# Altium PCB PIXRACER-R12.PcbDoc (part 1 of 2)
Units mm, origin at the board's own origin, x right, y up, seen from the top; angles counter-clockwise.
Board outline 36 x 36 mm, 4 copper layers (TOP, 2, 3, BOT), stack 1.492 mm thick; 137 components, 127 nets, 565 pads, 429 vias.
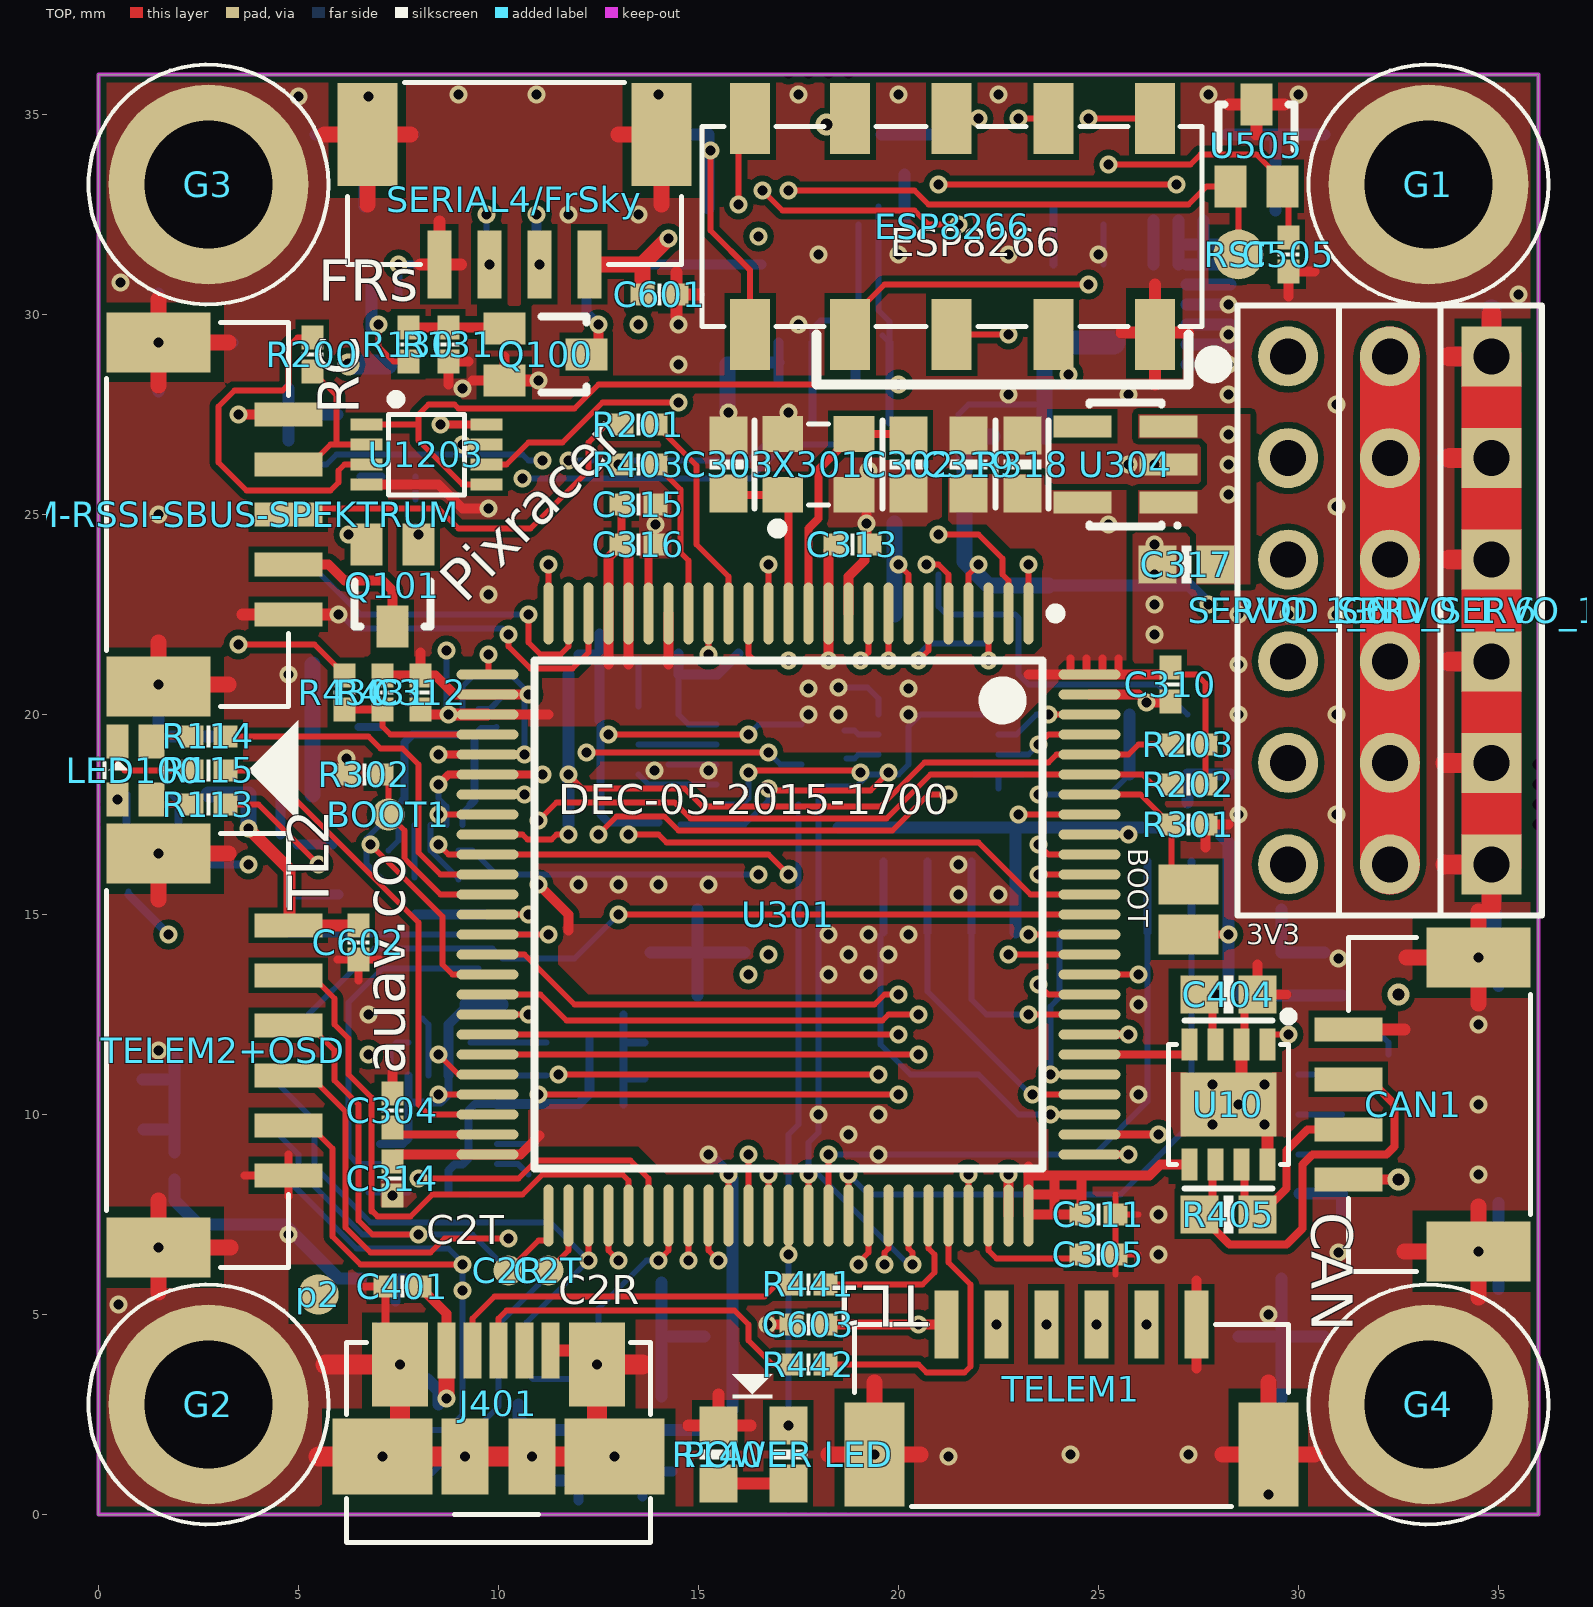
[diagram p0: TOP view]
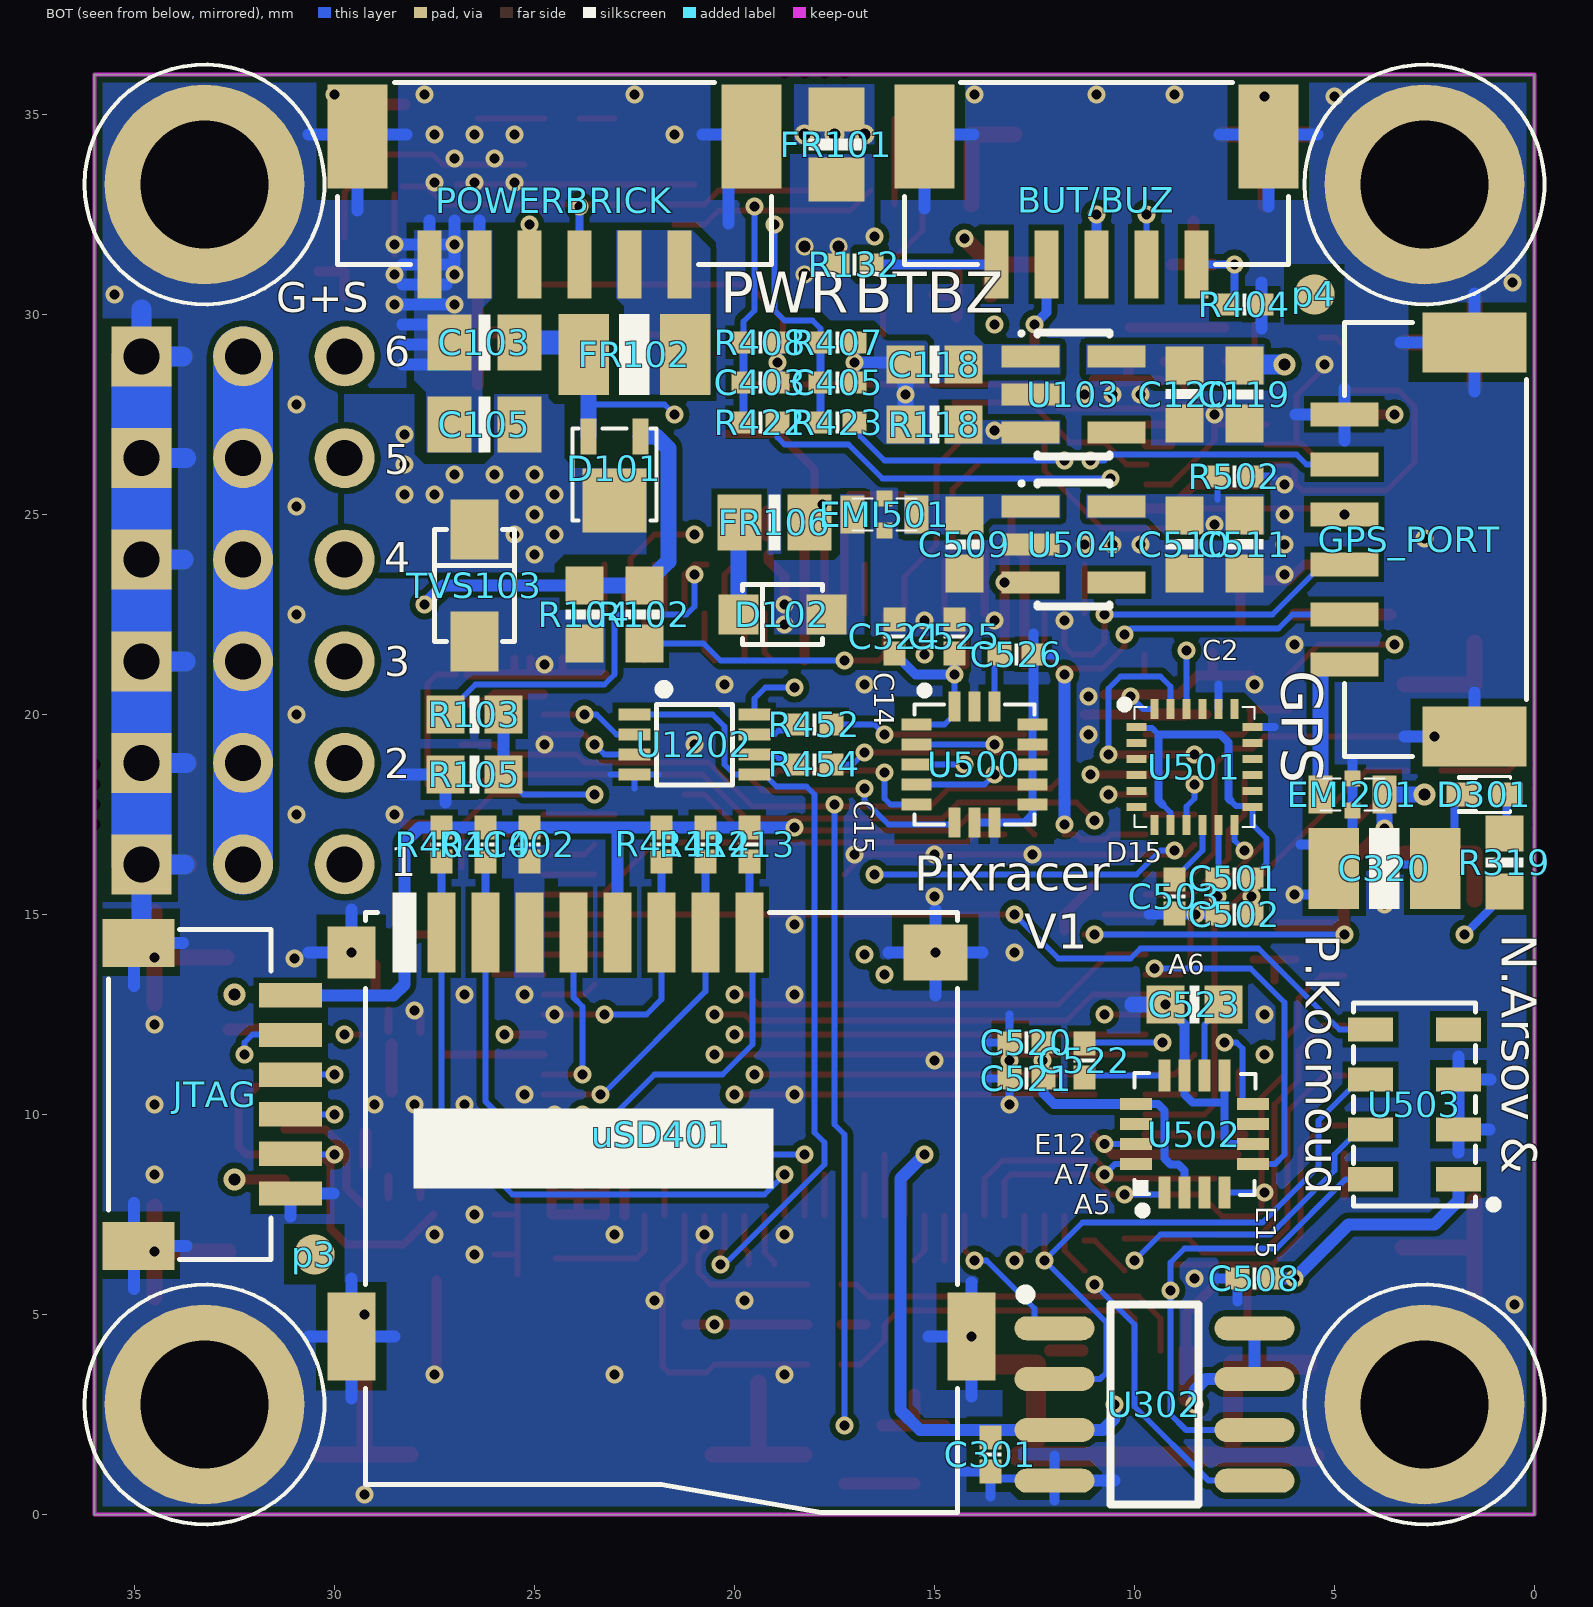
[diagram p1: BOT view, seen from below]
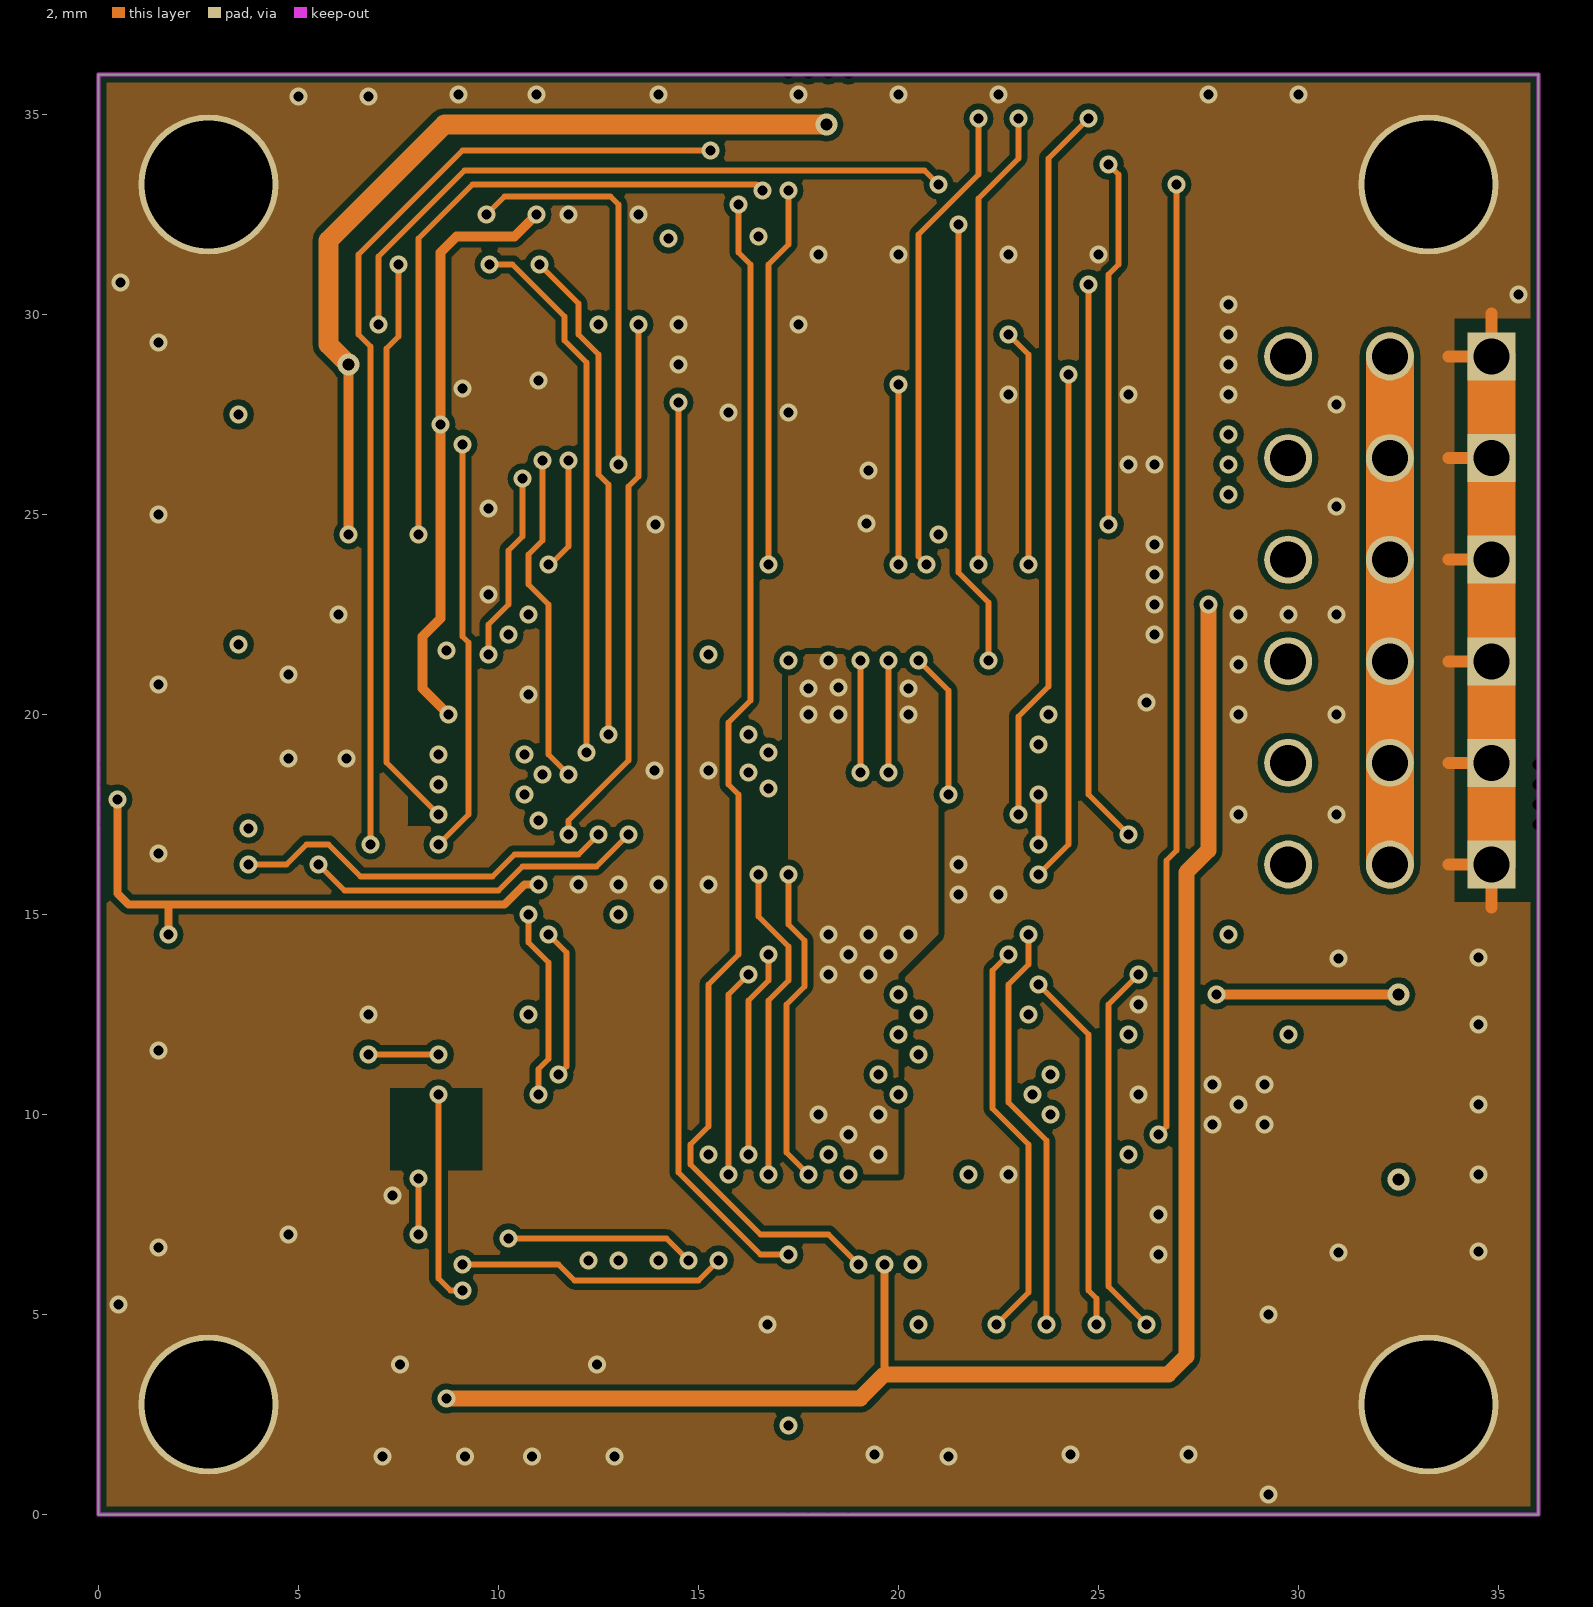
[diagram p2: 2]
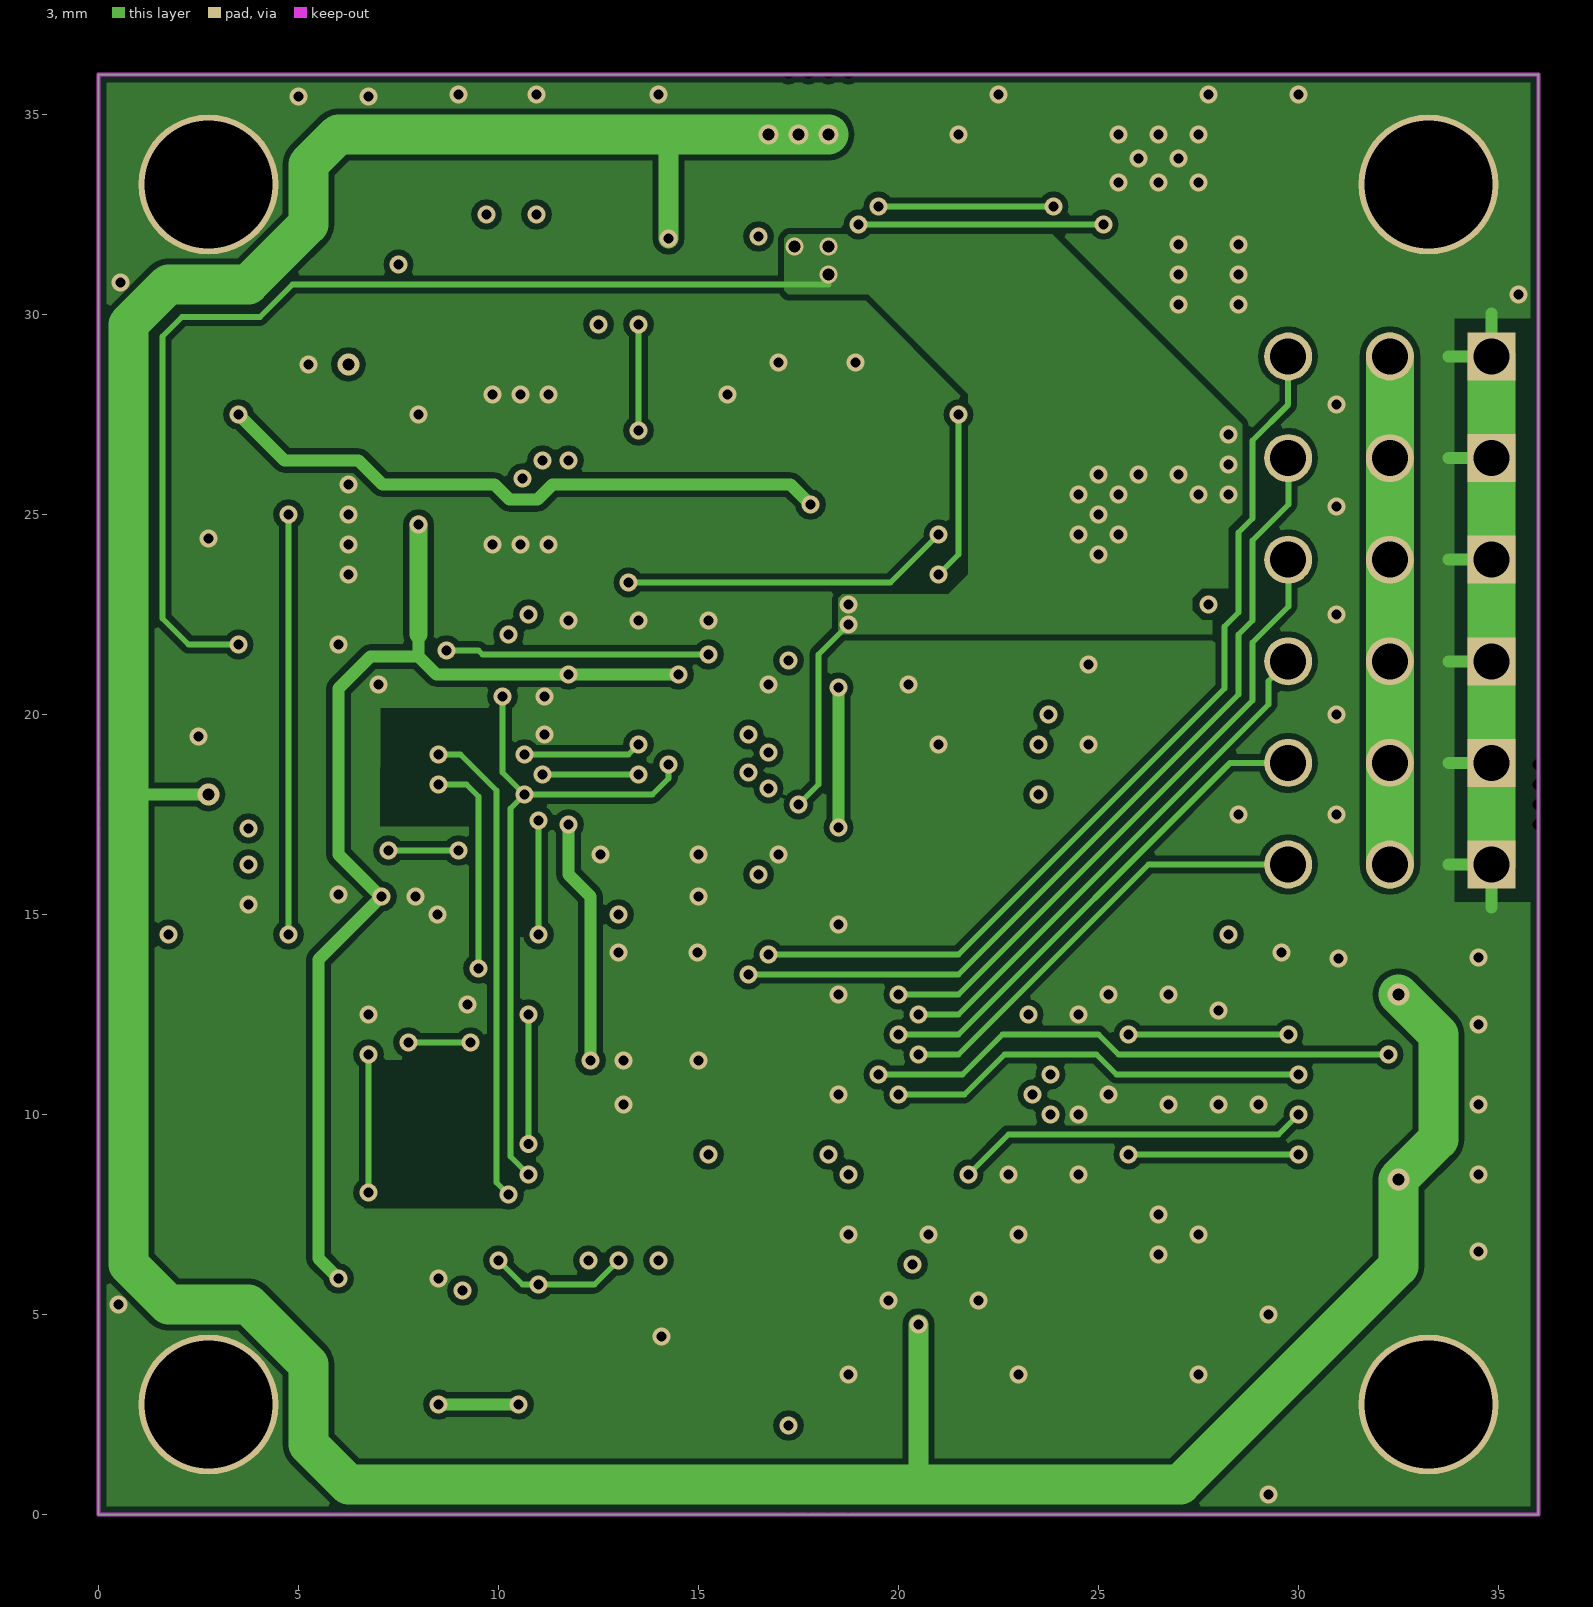
[diagram p3: 3]

## Layer stack, top to bottom
TOP: signal copper 0.0356
Dielectric: core 0.45, FR-4, Dk 4.8
2: signal copper 0.0356
Dielectric: prepreg 0.45, FR-4, Dk 4.8
3: signal copper 0.0356
Dielectric: core 0.45, FR-4, Dk 4.8
BOT: signal copper 0.0356

## Board outline
0,-0.003 36,-0.003 36,36 35.997,35.997 0,35.997 0,-0.003

## Design rules (kind name [scope] priority, off if disabled: settings)
Clearance [All] p1: gap=0.15
FabricationTestPointUsage TestPointUsage [All] p1: valid=0 allowmultiple=FALSE
FabricationTestpoint Testpoint [All] p1: side=3 testpointundercomponent=TRUE minsize=1.016 maxsize=2.54 preferedsize=1.524 minholesize=0 maxholesize=1.016 preferedholesize=0.813 testpointgrid=0.025 allowsidetop=TRUE allowsidebottom=TRUE usegrid=TRUE gridtolerance=0
PolygonConnect [All] p1: connectstyle=Direct reliefconductorwidth=0.3 reliefentries=4 polygonreliefangle="90 Angle" airgapwidth=0.15
RoutingVias [All] p1: holewidth=0.25 width=0.45 viastyle="Through Hole" minholewidth=0.25 minwidth=0.45 maxholewidth=0.25 maxwidth=0.45
SolderMaskExpansion [All] p1: expansion=0.05
Width [All] p1: maxlimit=0.15 minlimit=0.15 preferedwidth=0.15
26 further rules are at their usual default settings.

## Classes and differential pairs
component class PIXRACER-POWER-R09: BAT2- BAT3- BAT4- BAT5- BAT6- C103 C105 C118 C119 C120 D101 D102 FR101 FR102 FR106 G1 G2 G3 G4 LED100 p2 p3 p4 PDB+1 PDB+2 PDB+3 PDB+4 PDB+5 PDB+6 PGND1 PGND2 PGND3 PGND4 "POWER LED" Q100 Q101 R102 R103 R104 R105 R113 R114 R115 R118 R130 R131 R132 R140 TVS103 U103
component class PIXRACER-FMU-R09: 3.3 3V3 BOOT BOOT1 C2R C2T C301 C302 C303 C304 C305 C310 C311 C312 C313 C314 C315 C316 C317 C319 C320 C505 D301 JTAG R301 R302 R318 R319 RST U301 U302 U304 U505 X301
component class PIXRACER-IMU-R09: C501 C502 C503 C508 C509 C510 C511 C520 C521 C522 C523 C524 C525 C526 EMI501 R502 U500 U501 U502 U503 U504
component class PIXRACER-SD-USB-R09: C401 C402 C403 C404 C405 CAN1 J401 POWERBRICK R401 R405 R407 R408 R410 R411 R412 R413 R422 R423 R430 R431 R441 R442 U10 uSD401
component class PIXRACER-SERIALS-R09: BUT/BUZ C601 C602 C603 EMI201 ESP8266 GND_SERVO_1_6 GPS_PORT PPM-RSSI-SBUS-SPEKTRUM R200 R201 R202 R203 R403 R404 R452 R454 SERIAL4/FrSky SERVO_1_6 TELEM1 TELEM2+OSD U1202 U1203 VDD_SERVO_1_6

## Components (designator, comment, footprint, x,y, rotation, side; value= is the part's Value field where it differs from the comment)
3V3 "3V3" PAD1#1 27.25,14.5 r180 top
BOOT "BOOT" PAD1#1 27.25,15.75 r0 top (schematic designator B0)
BOOT1 "BOOT1" PAD1#2 7.25,17.5 r90 top
BUT/BUZ "GH" Molex_Clik_1.25_5H#1 10.95,31.25 r180 bottom locked
C2R "CAN2_RX" PAD1#3 10.25,6.1 r90 top
C2T "CAN2_TX" PAD1#3 11.25,6.1 r90 top
C103 "100uF 10V" 0805A 26.25,29.3 r0 bottom
C105 "100uF 10V" 0805A 26.25,27.25 r0 bottom
C118 "10uF 10V" 0603A#1 15,28.75 r180 bottom
C119 "10uF 6.3V" 0603A#1 7.25,28.003 r90 bottom
C120 "100n" 0603A#1 8.75,28.003 r90 bottom
C301 "100n" 0402A 13.6,1.5 r270 bottom
C302 "8p" 0603A#1 20.25,26.25 r90 top
C303 "8p" 0603A#1 15.75,26.25 r270 top
C304 "2u2" 0402A 7.35,10.1 r270 top
C305 "2u2" 0402A 25,6.5 r180 top
C310 "100n" 0402A 26.8,20.75 r270 top
C311 "100n" 0402A 25,7.5 r0 top
C312 "100n" 0402A 8.05,20.55 r90 top
C313 "100n" 0402A 18.85,24.25 r0 top
C314 "100n" 0402A 7.35,8.4 r270 top
C315 "2u2" 0402A 13.5,25.25 r0 top
C316 "2u2" 0402A 13.5,24.25 r0 top
C317 "2u2" 0603A#1 27.2,23.75 r0 top
C319 "10u" 0603A#1 21.75,26.25 r270 top
C320 "220uF 4V" 1206A 3.75,16.15 r180 bottom
C401 "100n" 0402A 7.6,5.7 r180 top
C402 "100n" 0402A 25.127,16.75 r90 bottom locked
C403 "100n" 0402A 19.35,28.3 r0 bottom
C404 "2u2" 0603A#1 28.25,13 r180 top
C405 "100n" 0402A 17.425,28.3 r0 bottom
C501 "2u2" 0402A 7.5,15.9 r0 bottom
C502 "100n" 0402A 7.5,15 r0 bottom
C503 "100n" 0402A 9,15.45 r270 bottom
C505 "100n" 0402A 29.75,31.5 r270 top
C508 "100n" 0402A 7,5.9 r0 bottom
C509 "2u2" 0603A#1 14.25,24.25 r90 bottom
C510 "100n" 0603A#1 8.75,24.253 r90 bottom
C511 "10u" 0603A#1 7.25,24.253 r90 bottom
C520 "2u2" 0402A 12.7,11.8 r0 bottom
C521 "100n" 0402A 12.7,10.9 r0 bottom
C522 "220n" 0402A 11.25,11.35 r270 bottom
C523 "4u7" 0603A#1 8.5,12.75 r180 bottom
C524 "2u2" 0402A 16,21.95 r90 bottom
C525 "100n" 0402A 14.5,21.95 r90 bottom
C526 "0u47" 0402A 12.95,21.5 r180 bottom
C601 "2u2" 0402A 14.025,30.5 r180 top
C602 "2u2" 0402A 6.5,14.3 r90 top
C603 "2u2" 0402A 17.75,4.75 r0 top
CAN1 "GH" Molex_1.25_click_4#1 31.25,10.25 r270 top locked
D101 "PMEG2020CP" pmeg2020cp 23,25.75 r180 bottom
D102 "PMEG1030" SOD323F 18.8,22.5 r0 bottom
D301 "BAS70-02V" SOD-523 1.25,18 r180 bottom
EMI201 "EMI_KNH16" EMI_KNH16_0603 4.55,18 r0 bottom
EMI501 "EMI_KNH16" EMI_KNH16_0603 16.25,25 r180 bottom
ESP8266 "2x5 0.1\"" 2.54MM_10PIN_SMD 21.35,32.2 r180 top locked
FR101 "1A RST FUSE" 0805A 17.45,34.25 r270 bottom
FR102 "2A RST FUSE" 1206A 22.5,29 r0 bottom
FR106 "0.3A RST FUSE" 0805A 19,24.8 r0 bottom
G1 "GND" SMT_PAD_ROUND#1 33.923,33.947 r0 top locked
G2 "GND" SMT_PAD_ROUND#2 3.573,3.497 r0 top locked
G3 "GND" SMT_PAD_ROUND#3 2.423,33.947 r0 top locked
G4 "GND" SMT_PAD_ROUND#4 33.728,1.902 r0 top locked
GND_SERVO_1_6 "Header 6" HDR1X6#1 34.823,16.25 r90 top locked
GPS_PORT "GH" Molex_Clok_1.25_6H#1 4.75,24.375 r270 bottom locked
J401 "miniUSB" USBmicro_B 10,0 r0 top locked
JTAG "JST SM06B" SM06B-SRSH-TB 33.05,10.5 r90 bottom locked
LED100 "LTST-C19HE1WT" LTST-C19HE1WT 0.9,18.6 r0 top
p2 "" SMT_PAD 5.5,5.5 r270 top
p3 "" SMT_PAD 30.5,6.5 r90 bottom
p4 "" SMT_PAD 5.5,30.5 r90 bottom
"POWER LED" "GREEN" 0603A#1 17.25,1.5 r270 top
POWERBRICK "JST GH" Molex_Clok_1.25_6H#2 24.5,31.25 r180 bottom locked
PPM-RSSI-SBUS-SPEKTRUM "GH" Molex_Clik_1.25_5H#2 4.75,25 r90 top locked
Q100 "DMG1012UW" 2N7002-SOT323 10.15,29.65 r270 top
Q101 "BSS223PW" 2N7002-SOT323 8,24.25 r180 top
R102 "10K" 0603A#1 22.25,22.5 r90 bottom
R103 "220R" 0603A#1 26.5,20 r180 bottom
R104 "470R" 0603A#1 23.75,22.5 r90 bottom
R105 "220R" 0603A#1 26.5,18.5 r0 bottom
R113 "100R" 0402A 2.75,17.75 r0 top
R114 "100R" 0402A 2.75,19.45 r0 top
R115 "100R" 0402A 2.75,18.6 r0 top
R118 "10k" 0603A#1 15,27.25 r180 bottom
R130 "10k" 0402A 7.75,29.25 r90 top
R131 "10k" 0402A 8.75,29.25 r90 top
R132 "0R0" 0402A 17,31.25 r180 bottom
R140 "220R" 0603A#1 15.5,1.5 r270 top
R200 "470R" 0402A 5.35,29 r90 top
R201 "10K" 0402A 13.5,27.25 r180 top
R202 "2k2" 0402A 27.25,18.25 r0 top locked
R203 "2k2" 0402A 27.25,19.25 r0 top locked
R301 "10k" 0402A 27.25,17.25 r180 top
R302 "10k" 0402A 6.65,18.5 r180 top
R318 "220R" 0603A#1 23.1,26.25 r270 top
R319 "1k" 0603A#2 0.75,16.3 r90 bottom
R401 "100k" 0402A 27.327,16.75 r270 bottom locked
R403 "68R" 0402A 13.5,26.25 r180 top
R404 "1K5" 0402A 7.25,30.25 r0 bottom
R405 "120R" 0603A#1 28.25,7.5 r180 top
R407 "1M" 0402A 17.425,29.3 r0 bottom
R408 "1M" 0402A 19.35,29.3 r0 bottom
R410 "100k" 0402A 26.227,16.75 r270 bottom locked
R411 "100k" 0402A 21.827,16.75 r270 bottom locked
R412 "100k" 0402A 20.727,16.75 r270 bottom locked
R413 "100k" 0402A 19.627,16.75 r270 bottom locked
R422 "10k" 0402A 19.35,27.3 r180 bottom
R423 "10k" 0402A 17.425,27.3 r180 bottom
R430 "10k" 0402A 6.15,20.55 r270 top
R431 "10k" 0402A 7.1,20.55 r270 top
R441 "22R" 0402A 17.75,5.75 r180 top
R442 "22R" 0402A 17.75,3.75 r180 top
R452 "1k" 0402A 18,19.75 r180 bottom
R454 "1k" 0402A 18,18.75 r180 bottom
R502 "220R" 0402A 7.5,25.95 r180 bottom
RST "BOOT" PAD1#4 28.5,31.5 r90 top
SERIAL4/FrSky "GH" Molex_1.25_click_4#2 10.4,31.25 r0 top locked
SERVO_1_6 "Header 6" HDR1X6#2 29.743,16.25 r90 top locked
TELEM1 "GH" Molex_Clok_1.25_6H#1 24.325,4.75 r180 top
TELEM2+OSD "GH" Molex_Clok_1.25_6H#1 4.75,11.6 r90 top locked
TVS103 "5.6V" SOD123F 26.5,23.225 r90 bottom
U10 "TJA1051T" 8DFN_3x3 28.25,10.25 r180 top
U103 "AP7365-33WG-7" SOT23-5 11.525,28.003 r270 bottom
U301 "STM32F427VIT6" LQFP100_L 17.25,15 r270 top locked
U302 "FM25V02-G" SO-8_N 9.5,2.75 r180 bottom locked
U304 "LP5907-Q1" SOT23-5 25.675,26.25 r90 top locked
U500 "ICM-20608-G" HCLGA-16L 14.002,18.75 r180 bottom
U501 "MPU9250/6500" MPU6500-9250 8.5,18.691 r180 bottom
U502 "HMC5983" HMC5883L 8.5,9.509 r90 bottom
U503 "MS5611" MS5611 3,10.25 r0 bottom
U504 "LP5907-Q1" SOT23-5 11.523,24.25 r270 bottom
U505 "MCP131" SOT-323 28.95,34.225 r0 top
U1202 "74LVC2G86" DCU(SM-8) 21,19.25 r270 bottom
U1203 "74LVC2G86" DCU(SM-8) 8.2,26.5 r270 top
uSD401 "MicroSD" MicroSD_China_01 21.827,4.05 r180 bottom locked
VDD_SERVO_1_6 "Header 6" HDR1X6#2 32.283,16.25 r90 top locked
X301 "24MHz" Crystal_2.5x2 18,26.25 r0 top

## Footprints (in the part's own frame and the unit in brackets; to place one, negate y for a bottom-side part, rotate by r counter-clockwise, add the part's x,y. Pads: shape width x height; smd on the part's side, far side on the other; paste and mask are expansions set on the pad)
2.54MM_10PIN_SMD [mm]
  rect 1x1.78 smd mask+0.051: 1(-5.06,-2.7) 2(-5.06,2.7) 3(-2.52,-2.7) 4(-2.52,2.7) 5(0.02,-2.7) 6(0.02,2.7) 7(2.56,-2.7) 8(2.56,2.7) 9(5.06,-2.7) 10(5.06,2.7)
  silkscreen extent -6.24,-2.5 6.26,2.5
2N7002-SOT323 [mm]
  rect 0.8x1.05 smd mask+0.051: 1(0.65,2.05) 2(1.3,0) 3(0,0)
  silkscreen extent -0.3,0.93 1.6,2.05
8DFN_3x3 [mm]
  rect 0.4x0.8 smd mask+0.051: 1(-0.975,-1.5) 2(-0.325,-1.5) 3(0.325,-1.5) 4(0.975,-1.5) 5(0.975,1.5) 6(0.325,1.5) 7(-0.325,1.5) 8(-0.975,1.5)
  rect 2.4x1.6 smd paste-0.2 mask+0.051: EP(0,0)
  silkscreen extent -1.6,-2.3 1.5,1.5
0402A [mm]
  rect 0.6x0.55 smd mask+0.051: 1(0.425,0) 2(-0.425,0)
  silkscreen extent -0.05,-0.27 0.05,0.28
0603A#1 [mm]
  rect 0.95x0.95 smd mask+0.051: 1(-0.725,0) 2(0.725,0)
  silkscreen extent -0.13,-0.47 0.13,0.48
0603A#2 [mm]
  rect 0.9x0.95 smd mask+0.051: 1(-0.725,0) 2(0.725,0)
  silkscreen extent -0.13,-0.48 0.13,0.48
0805A [mm]
  rect 1.1x1.4 smd mask+0.051: 1(0.875,0) 2(-0.875,0)
  silkscreen extent -0.15,-0.7 0.15,0.7
1206A [mil]
  rect 50x80 smd mask+2: 1(-50,0) 2(50,0)
  silkscreen extent -15,-40 15,40
Crystal_2.5x2 [mil]
  rect 40x35 smd mask+2: 1(-35,-30) 2(35,-30) 3(35,30) 4(-35,30)
  silkscreen extent -50,-68 50,40
DCU(SM-8) [mm]
  rect 0.3x0.8 smd mask+0.051: 1(-0.75,-1.5) 2(-0.25,-1.5) 3(0.25,-1.5) 4(0.75,-1.5) 5(0.75,1.5) 6(0.25,1.5) 7(-0.25,1.5) 8(-0.75,1.5)
  silkscreen extent -1.49,-0.95 1.02,0.95
EMI_KNH16_0603 [mm]
  rect 0.6x0.95 smd mask+0.026: 1(-0.8,0) 2(0.8,0)
  rect 0.4x0.4 smd mask+0.026: 3(0,0.4) 4(0,-0.4)
  silkscreen extent -0.8,-0.4 0.8,0.4
HCLGA-16L [mm]
  rect 0.75x0.3 smd mask+0.05: 1(-1.45,1) 2(-1.45,0.5) 3(-1.45,0) 4(-1.45,-0.5) 5(-1.45,-1) 9(1.45,-1) 10(1.45,-0.5) 11(1.45,0) 12(1.45,0.5) 13(1.45,1)
  rect 0.3x0.75 smd mask+0.05: 6(-0.5,-1.45) 7(0,-1.45) 8(0.5,-1.45) 14(0.5,1.45) 15(0,1.45) 16(-0.5,1.45)
  silkscreen extent -1.5,-1.5 1.5,1.95
HDR1X6#1 [mm] "Connector; Header; 6 Position"
  rect 1.5x1.5 / inner rect 1.2x1.2 / far side rect 1.5x1.5 hole 0.9: 1(0,0) 2(2.54,0) 3(5.08,0) 4(7.62,0) 5(10.16,0) 6(12.7,0)
  silkscreen extent -1.27,-1.27 13.97,1.27
HDR1X6#2 [mm] "Connector; Header; 6 Position"
  round 1.5 / inner round 1.2 / far side round 1.5 hole 0.9: 1(0,0) 2(2.54,0) 3(5.08,0) 4(7.62,0) 5(10.16,0) 6(12.7,0)
  silkscreen extent -1.27,-1.27 13.97,1.27
HMC5883L [mil]
  rect 31.5x11.81 smd mask+2: 1(-57.5,29.53) 2(-57.5,9.84) 3(-57.5,-9.84) 4(-57.5,-29.53) 9(57.5,-29.53) 10(57.5,-9.84) 11(57.5,9.84) 12(57.5,29.53)
  rect 11.81x31.5 smd mask+2: 5(-29.53,-57.5) 6(-9.84,-57.5) 7(9.84,-57.5) 8(29.53,-57.5) 13(29.53,57.5) 14(9.84,57.5) 15(-9.84,57.5) 16(-29.53,57.5)
  silkscreen extent -79,-60 60,59
LQFP100_L [mm] "Thin QFP, 100-Leads, Body 14x14mm, Pitch 0.5mm, IPC High Density"
  oval 1.55x0.25 smd: 1(-7.525,6) 2(-7.525,5.5) 3(-7.525,5) 4(-7.525,4.5) 5(-7.525,4) 6(-7.525,3.5) 7(-7.525,3) 8(-7.525,2.5) 9(-7.525,2) 10(-7.525,1.5) 11(-7.525,1) 12(-7.525,0.5) 13(-7.525,0) 14(-7.525,-0.5) 15(-7.525,-1) 16(-7.525,-1.5) 17(-7.525,-2) 18(-7.525,-2.5) 19(-7.525,-3) 20(-7.525,-3.5) 21(-7.525,-4) 22(-7.525,-4.5) 23(-7.525,-5) 24(-7.525,-5.5) 25(-7.525,-6) 51(7.525,-6) 52(7.525,-5.5) 53(7.525,-5) 54(7.525,-4.5) 55(7.525,-4) 56(7.525,-3.5) 57(7.525,-3) 58(7.525,-2.5) 59(7.525,-2) 60(7.525,-1.5) 61(7.525,-1) 62(7.525,-0.5) 63(7.525,0) 64(7.525,0.5) 65(7.525,1) 66(7.525,1.5) 67(7.525,2) 68(7.525,2.5) 69(7.525,3) 70(7.525,3.5) 71(7.525,4) 72(7.525,4.5) 73(7.525,5) 74(7.525,5.5) 75(7.525,6)
  oval 0.25x1.55 smd: 26(-6,-7.525) 27(-5.5,-7.525) 28(-5,-7.525) 29(-4.5,-7.525) 30(-4,-7.525) 31(-3.5,-7.525) 32(-3,-7.525) 33(-2.5,-7.525) 34(-2,-7.525) 35(-1.5,-7.525) 36(-1,-7.525) 37(-0.5,-7.525) 38(0,-7.525) 39(0.5,-7.525) 40(1,-7.525) 41(1.5,-7.525) 42(2,-7.525) 43(2.5,-7.525) 44(3,-7.525) 45(3.5,-7.525) 46(4,-7.525) 47(4.5,-7.525) 48(5,-7.525) 49(5.5,-7.525) 50(6,-7.525) 76(6,7.525) 77(5.5,7.525) 78(5,7.525) 79(4.5,7.525) 80(4,7.525) 81(3.5,7.525) 82(3,7.525) 83(2.5,7.525) 84(2,7.525) 85(1.5,7.525) 86(1,7.525) 87(0.5,7.525) 88(0,7.525) 89(-0.5,7.525) 90(-1,7.525) 91(-1.5,7.525) 92(-2,7.525) 93(-2.5,7.525) 94(-3,7.525) 95(-3.5,7.525) 96(-4,7.525) 97(-4.5,7.525) 98(-5,7.525) 99(-5.5,7.525) 100(-6,7.525)
  silkscreen extent -7.65,-6.35 6.35,6.8, body extent -7,-7 7,7, height 1.6
LTST-C19HE1WT [mm]
  rect 0.55x0.85 smd mask+0.05: 1(-0.425,0.725) 4(-0.425,-0.725)
  rect 0.65x0.85 smd mask+0.05: 2(0.425,0.725) 3(0.425,-0.725)
  silkscreen extent -0.75,-0.2 0.75,0.2
MicroSD_China_01 [mm]
  rect 0.7x2 smd mask+0.051: 1(2.2,10.5) 2(1.1,10.5) 3(0,10.5) 4(-1.1,10.5) 5(-2.2,10.5) 6(-3.3,10.5) 7(-4.4,10.5) 8(-5.5,10.5)
  rect 0x0 smd mask+0.051: 9(-6.6,10.5)
  rect 1.2x2.2 smd mask+0.051: GND(-7.75,0.4) GND(7.75,0.4)
  rect 1.2x1.3 smd mask+0.051: GND(-7.75,10)
  rect 1.6x1.4 smd mask+0.051: GND(6.85,10)
  silkscreen extent -7.4,-4 7.4,11
Molex_1.25_click_4#1 [mm]
  rect 0.6x1.7 smd mask+0.051: 1(1.875,0) 2(0.625,0) 3(-0.625,0) 4(-1.875,0)
  rect 1.5x2.6 smd mask+0.051: GND(-3.675,3.25) GND(3.675,3.25)
  silkscreen extent -4.18,0 4.18,4.55
Molex_1.25_click_4#2 [mm]
  rect 0.6x1.7 smd mask+0.051: 1(1.875,0) 2(0.625,0) 3(-0.625,0) 4(-1.875,0)
  rect 1.5x2.58 smd mask+0.051: GND(-3.675,3.25) GND(3.675,3.25)
  silkscreen extent -4.18,0 4.18,4.55
Molex_Clik_1.25_5H#1 [mm]
  rect 0.6x1.7 smd mask+0.051: 1(2.5,0) 2(1.25,0) 3(0,0) 4(-1.25,0) 5(-2.5,0)
  rect 1.5x2.6 smd mask+0.051: GND(-4.3,3.2) GND(4.3,3.2)
  silkscreen extent -4.8,0 4.8,4.55
Molex_Clik_1.25_5H#2 [mm]
  rect 0.6x1.7 smd mask+0.051: 1(2.5,0) 2(1.25,0) 3(0,0) 4(-1.25,0) 5(-2.5,0)
  rect 1.5x2.6 smd mask+0.051: GND(-4.3,3.25) GND(4.3,3.25)
  silkscreen extent -4.8,0 4.8,4.55
Molex_Clok_1.25_6H#1 [mm]
  rect 0.6x1.7 smd mask+0.051: 1(3.125,0) 2(1.875,0) 3(0.625,0) 4(-0.625,0) 5(-1.875,0) 6(-3.125,0)
  rect 1.5x2.6 smd mask+0.051: GND(-4.925,3.25) GND(4.925,3.25)
  silkscreen extent -5.43,0 5.43,4.55
Molex_Clok_1.25_6H#2 [mm]
  rect 0.6x1.7 smd mask+0.051: 1(3.125,0) 2(1.875,0) 3(0.625,0) 4(-0.625,0) 5(-1.875,0) 6(-3.125,0)
  rect 1.5x2.6 smd mask+0.051: GND(-4.925,3.2) GND(4.925,3.2)
  silkscreen extent -5.43,0 5.43,4.55
MPU6500-9250 [mm]
  rect 0.5x0.2 smd: 1(-1.45,1) 2(-1.45,0.6) 3(-1.45,0.2) 4(-1.45,-0.2) 5(-1.45,-0.6) 6(-1.45,-1) 13(1.45,-1) 14(1.45,-0.6) 15(1.45,-0.2) 16(1.45,0.2) 17(1.45,0.6) 18(1.45,1)
  rect 0.2x0.5 smd: 7(-1,-1.45) 8(-0.6,-1.45) 9(-0.2,-1.45) 10(0.2,-1.45) 11(0.6,-1.45) 12(1,-1.45) 19(1,1.45) 20(0.6,1.45) 21(0.2,1.45) 22(-0.2,1.45) 23(-0.6,1.45) 24(-1,1.45)
  silkscreen extent -1.85,-1.5 1.5,1.66
MS5611 [mil]
  rect 44x24 smd mask+2: 1(-43.3,73.8) 2(-43.3,24.6) 3(-43.3,-24.6) 4(-43.3,-73.8) 5(43.3,-73.8) 6(43.3,-24.6) 7(43.3,24.6) 8(43.3,73.8)
  silkscreen extent -81,-100 60,101
PAD1#1 [mm]
  rect 1.5x1 smd paste-2 mask+0.051: 1(0,0)
PAD1#2 [mm]
  round 0.8 smd paste-0.635 mask+0.051: 1(0,0)
PAD1#3 [mm]
  round 0.75 smd paste-1 mask+0.051: 1(0,0)
PAD1#4 [mm]
  round 1.25 smd paste-1 mask+0.051: 1(0,0)
pmeg2020cp [mm]
  rect 0.4x0.9 smd mask+0.051: 1(-0.65,1.2) 2(0.65,1.2)
  rect 1.6x1.6 smd paste-0.1 mask+0.051: 3(0,-0.4)
  silkscreen extent -1.05,-0.9 1.05,1.4
SM06B-SRSH-TB [mil]
  rect 24x62 smd mask+2: 1(97.5,-77) 2(58.5,-77) 3(19.5,-77) 4(-19.5,-77) 5(-58.5,-77) 6(-97.5,-77)
  rect 47.24x70.87 smd mask+2: GND(-149,72.83) GND(149,72.83)
  silkscreen extent -162,-58 162,102
SMT_PAD [mm]
  round 1 smd paste-0.635: 1(0,0)
SMT_PAD_ROUND#1 [mm]
  round 5 / inner round 3.5 / far side round 5 hole 3.2 mask+0.051: 1(-0.673,-0.697)
SMT_PAD_ROUND#2 [mm]
  round 5 / inner round 3.5 / far side round 5 hole 3.2 mask+0.051: 1(-0.823,-0.747)
SMT_PAD_ROUND#3 [mm]
  round 5 / inner round 3.5 / far side round 5 hole 3.2 mask+0.1: 1(0.327,-0.697)
SMT_PAD_ROUND#4 [mm]
  round 5 / inner round 3.5 / far side round 5 hole 3.2 mask+0.051: 1(-0.478,0.848)
SO-8_N [mm] "8-Pin Small Outline Integrated Circuit 1.27 mm Pitch, IPC Medium Density"
  oval 2x0.6 smd: 1(-2.5,1.905) 2(-2.5,0.635) 3(-2.5,-0.635) 4(-2.5,-1.905) 5(2.5,-1.905) 6(2.5,-0.635) 7(2.5,0.635) 8(2.5,1.905)
  silkscreen extent -3.35,-2.5 1.1,2.87, body extent -2,-2.5 2,2.5, height 1.75
SOD123F [mm]
  rect 1.5x1.2 smd mask+0.051: 1(-1.4,0) 2(1.4,0)
  silkscreen extent -1.4,-1 1.4,1
SOD323F [mm]
  rect 1x1 smd mask+0.051: 1(-1.1,0) 2(1.1,0)
  silkscreen extent -1,-0.75 1,0.75
SOD-523 [mm]
  rect 0.8x0.6 smd mask+0.051: 1(0.55,0) 2(-0.55,0)
  silkscreen extent -0.65,-0.45 0.65,0.45
SOT23-5 [mm] "SOT-23/SC-74A; 5 Leads; Body 3 x 3 mm, inc. leads (LxW max)"
  rect 0.55x1.45 smd: 1(-0.95,-1.075) 2(0,-1.075) 3(0.95,-1.075) 4(0.95,1.075) 5(-0.95,1.075)
  silkscreen extent -1.57,-1.35 1.55,0.9
SOT-323 [mm] "SOT-323/SC-70; 3 Leads; Body 2.2 x 2.2 mm, inc. leads (LxW max)"
  rect 0.8x1.05 smd: 1(-0.65,-1.025) 2(0.65,-1.025) 3(0,1.025)
  silkscreen extent -0.95,-0.1 0.95,1.03
USBmicro_B [mm]
  rect 0.45x1.4 smd mask+0.051: 1(-1.3,4.1) 2(-0.65,4.1) 3(0,4.1) 4(0.65,4.1) 5(1.3,4.1)
  rect 1.4x2.1 smd mask+0.051: 6(-2.462,3.75) 6(2.462,3.75)
  rect 1.175x1.9 smd mask+0.051: 6(-0.835,1.45) 6(0.835,1.45)
  rect 2.5x1.9 smd mask+0.051: 7(-2.9,1.45) 7(2.9,1.45)
  silkscreen extent -3.8,-0.7 3.8,4.3

## Part data
3V3 BOOT BOOT1 C2R C2T RST: library part PLUG
BUT/BUZ PPM-RSSI-SBUS-SPEKTRUM: library part "Header 5", "Header, 5-Pin"
C103 C105 C118 C119 C120 C301 C302 C303 C304 C305 C310 C311 C312 C313 C314 C315 C316 C317 C319 C320 C401 C402 C403 C404 C405 C501 C502 C503 C505 C508 C509 C510 C511 C520 C521 C522 C523 C524 C525 C526 C601 C602 C603: library part Cap, "Capacitor"
CAN1 SERIAL4/FrSky: library part "Header 4", "Header, 4-Pin"
D102 D301: library part "D Schottky", "Schottky Diode"
ESP8266: library part "Header 10", "Header, 10-Pin"
FR101 FR102 FR106: library part "Fuse 1", "Fuse"
G1 G2 G3 G4: library part PLUG, "Plug"
GND_SERVO_1_6 SERVO_1_6 VDD_SERVO_1_6: "Header, 6-Pin"
GPS_PORT JTAG POWERBRICK TELEM1 TELEM2+OSD: library part "Header 6", "Header, 6-Pin"
J401: library part MicroUSB
LED100: library part RGB_LED_5MM
p2 p3 p4: library part Plug, "Plug"
"POWER LED": library part LED0, "Typical INFRARED GaAs LED"
Q100: library part NMOS-2, "N-Channel Power MOSFET"
Q101: library part MOSFET-P, "P-Channel MOSFET"
R102 R103 R104 R105 R113 R114 R115 R118 R130 R131 R132 R140 R200 R201 R202 R203 R301 R302 R318 R319 R401 R403 R404 R405 R407 R408 R410 R411 R412 R413 R422 R423 R430 R431 R441 R442 R452 R454 R502: library part Res2, "Resistor"
TVS103: library part "D Zener", "Zener Diode"
U103: library part LP5907-Q1
U301: library part STM32F103VBT6, "STM32 ARM-based 32-bit MCU with 64 Kbytes Flash, 100-pin LQFP, Industrial Temperature"
U302: library part AT45DB161D-MU
U501: library part MPU6500
U503: library part MS5611-01BA03
U505: library part MCP102
X301: library part Crystal_4pin

## Free pads (board coordinates)
  round 0 hole 0.3 unplated: 0(-0.1,17.25) 0(-0.1,17.75) 0(-0.1,18.25) 0(-0.1,18.75) 0(17.25,36.05) 0(17.25,-0.1) 0(17.75,-0.1) 0(17.75,36.05) 0(18.25,-0.1) 0(18.25,36.05) 0(18.75,36.05) 0(18.75,-0.1) 0(36,17.25) 0(36,17.75) 0(36,18.25) 0(36,18.75)

## Via types
v1: diameter 0.45, hole 0.25, TOP to 2, tented both sides, 172 vias
v2: diameter 0.45, hole 0.25, 3 to BOT, tented bottom, 122 vias
v3: diameter 0.45, hole 0.25, TOP to BOT, tented both sides, 96 vias
v4: diameter 0.45, hole 0.25, TOP to 2, tented top, 10 vias
v5: diameter 0.45, hole 0.25, 3 to BOT, tented both sides, 9 vias
v6: diameter 0.45, hole 0.25, 3 to BOT, 6 vias
v7: diameter 0.45, hole 0.3, 3 to BOT, tented bottom, 3 vias
v8: diameter 0.45, hole 0.25, TOP to BOT, tented top, 3 vias
v9: diameter 0.5, hole 0.3, 3 to BOT, tented bottom, 3 vias
v10: diameter 0.55, hole 0.3, TOP to BOT, tented both sides, 3 vias
v11: diameter 0.55, hole 0.3, 3 to BOT, tented bottom, 1 vias
v12: diameter 0.55, hole 0.3, TOP to 2, tented top, 1 vias

## Nets (pads, with @x,y where several pads share a name; then routed paths per layer and width w, separated by ;. In a path a pad name is that pad's centre, name@x,y a point inside that pad or via, vN(x,y) a via of type N, cw(c..) or ccw(c..) an arc to the next point about the centre after c; other vN are vias at no path point)
8266_CTS: ESP8266.10 U301.41 | length 34.7
  TOP w0.15: v1(6.8,16.75) 8.6,14.95 8.6,13.75 8.85,13.5 U301.41@9.725,13.5 ; v1(15.3,34.1) 15.3,32.1 16.29,31.11 ESP8266.10@16.29,29.5
  2 w0.15: v1(6.8,16.75) 6.8,29.2 6.5,29.5 6.5,31.5 9.1,34.1 v1(15.3,34.1)
8266_GPIO0: ESP8266.6 U301.1 | length 8.6
  TOP w0.15: ESP8266.6@21.33,29.5 v1(22.75,29.5) ; U301.1@23.25,22.525 v1(23.25,23.75)
  2 w0.15: v1(22.75,29.5) 23.25,29 v1(23.25,23.75)
8266_GPIO2: ESP8266.4 U301.90 | length 14.1
  TOP w0.15: v1(23.5,16) U301.90@24.775,16
  2 w0.15: v1(23.5,16) 24.25,16.75 v1(24.25,28.5)
8266_PD: ESP8266.3 U301.4 | length 13.8
  TOP w0.15: U301.4@21.75,22.525 21.75,23.5 v1(22,23.75) ; v1(23,34.9) ESP8266.3@23.87,34.9
  2 w0.15: v1(22,23.75) 22,32.9 23,33.9 v1(23,34.9)
8266_RST: ESP8266.5 U301.5 | length 13.5
  TOP w0.15: v1(20.7,23.75) 21,23.75 21.25,23.5 U301.5@21.25,22.525
  2 w0.15: v1(20.7,23.75) 20.5,23.95 20.5,32 22,33.5 v1(22,34.9)
8266_RTS: ESP8266.9 U301.67 | length 33.7
  TOP w0.15: v1(16,32.75) ESP8266.9@16,34.89 ; v1(19,6.25) 19,6.3 19.25,6.55 U301.67@19.25,7.475
  2 w0.15: v1(16,32.75) 16,31.55 16.3,31.25 16.3,20.35 15.75,19.8 15.75,18.25 16,18 16,14 15.25,13.25 15.25,9.7 14.8,9.25 14.8,8.75 16.55,7 18.25,7 v1(19,6.25)
20608_CS: U301.9 U500.5 | length 8.3
  TOP w0.15: v8@16.3,18.6 18.9,18.6 v1@19,18.5 ; v1(19.05,21.35) 19.25,21.55 U301.9@19.25,22.525
  2 w0.15: v1(19.05,18.55) v1(19.05,21.35)
  BOT w0.15: U500.5@15.452,17.75 16.1,17.75 16.25,17.9 v8(16.25,18.55)
20608_DRDY: U301.8 U500.6 | length 9.9
  TOP w0.15: v8(16.75,18.15) 16.8,18.1 19.3,18.1 v1(19.75,18.55) ; v1(19.75,21.35) U301.8@19.75,22.525
  2 w0.15: v1(19.75,18.55) v1(19.75,21.35)
  BOT w0.15: U500.6@14.552,17.25 16.15,17.25 16.75,17.85 v8(16.75,18.15)
\R\S\T\: RST.1 U301.14 U505.1 | length 23.7
  TOP w0.15: U301.14@16.75,22.525 v1(16.75,23.75) ; v1(17.25,33.1) 20.4,33.1 20.75,32.75 27.25,32.75 27.7,33.2 U505.1@28.3,33.2 ; RST.1@28.5,31.5 U505.1@28.5,33
  2 w0.15: v1(16.75,23.75) 16.75,31.25 17.25,31.75 v1(17.25,33.1)
ALARM: R130.2 U301.77 | length 49.8
  TOP w0.15: v1(7,29.75) 7,29.2 7.375,28.825 R130.2@7.75,28.825 ; v1(21,33.25) v1(26.95,33.25)
  TOP w0.2: U301.77@24.775,9.5 v1(26.5,9.5)
  2 w0.15: v1(7,29.75) 7,31.45 9.15,33.6 20.65,33.6 v1(21,33.25) ; v1(26.5,9.5) 26.7,9.7 26.7,16.35 26.95,16.6 v1(26.95,33.25)
BARO_CS: U301.88 U503.5 | length 22.1
  TOP w0.15: v3(13,15) U301.88@24.775,15
  BOT w0.15: U503.5@4.1,12.125 4.875,12.125 6.9,14.15 9.85,14.15 10.1,13.9 11.9,13.9 v3(13,15)
BATT_CURRENT_SENS: R422.1 U301.26 | length 14.4
  TOP w0.15: U301.26@9.75,21 v1(9.75,21.5)
  2 w0.15: v1(9.75,21.5) 9.75,22.25 10.25,22.75 10.25,24.1 10.6,24.45 v3(10.6,25.9)
  BOT w0.15: v3(10.6,25.9) 16.3,25.9 17.15,26.75 18.75,26.75 18.925,26.925 R422.1@18.925,27.3
BATT_VOLT_SENS: R423.1 U301.25 | length 9.8
  TOP w0.15: U301.25@11.25,22.525 v1(11.25,23.75)
  2 w0.15: v1(11.25,23.75) 11.3,23.75 11.75,24.2 v3(11.75,26.35)
  BOT w0.15: v3(11.75,26.35) 16.25,26.35 16.85,26.95 16.85,27.15 R423.1@17,27.3
BOOT0: BOOT.1 R301.1 U301.94 | length 3.4
  TOP w0.15: U301.94@24.775,18 26.05,18 26.8,17.25 R301.1@26.825,17.25 BOOT.1@26.825,16.175
BUZZER+: BUT/BUZ.5 R132.1 | length 3.1
  BOT w0.25: BUT/BUZ.5@13.45,31.25 R132.1@16.575,31.25
BUZZER-: BUT/BUZ.4 Q100.1 | length 2.1
  TOP w0.25: Q100.1@12.5,29.3 v3(12.5,29.75)
  BOT w0.25: BUT/BUZ.4@12.2,31.25 12.2,30.05 v3(12.5,29.75)
CAN1_RX: U10.4 U301.81 | length 2.4
  TOP w0.2: U301.81@24.775,11.5 U10.4@27.2,11.5
CAN1_TX: U10.1 U301.82 | length 5.4
  TOP w0.15: U10.1@29.35,12 v3(29.75,12)
  TOP w0.2: U301.82@24.775,12 v3(25.75,12)
  3 w0.15: v3(25.75,12) v3(29.75,12)
CAN2_RX: C2R.1 U301.51 | length 1.3
  TOP w0.15: C2R.1@10.25,6.1 11,6.85 U301.51@11.25,6.85
CAN2_TX: C2T.1 U301.52 | length 1.6
  TOP w0.15: C2T.1@11.25,6.1 11.75,6.6 U301.52@11.75,7.475
FMU_CH1: SERVO_1_6.1 U301.45 | length 22
  TOP w0.15: U301.45@9.725,11.5 v3(20.5,11.5)
  3 w0.15: v3(20.5,11.5) 21.5,11.5 26.25,16.25 SERVO_1_6.1@29.743,16.25
FMU_CH2: SERVO_1_6.2 U301.44 | length 22.8
  TOP w0.15: U301.44@9.725,12 v3(20,12)
  3 w0.15: v3(20,12) 21.5,12 28.292,18.791 SERVO_1_6.2@29.742,18.791
FMU_CH3: SERVO_1_6.3 U301.42 | length 24.4
  TOP w0.15: U301.42@9.725,13 11.05,13 11.7,12.35 19.6,12.35 19.75,12.5 v3(20.5,12.5)
  3 w0.15: v3(20.5,12.5) 21.5,12.5 29.25,20.25 29.25,20.837 SERVO_1_6.3@29.743,21.33
FMU_CH4: SERVO_1_6.4 U301.40 | length 26.7
  TOP w0.15: U301.40@9.725,14 10.65,14 11.9,12.75 19.4,12.75 19.65,13 v3(20,13)
  3 w0.15: v3(20,13) 21.5,13 28.85,20.35 28.85,21.8 29.75,22.7 29.75,23.863 SERVO_1_6.4@29.743,23.87
FMU_CH5: SERVO_1_6.5 U301.60 | length 27.8
  TOP w0.15: U301.60@15.75,7.475 v1(15.75,8.5)
  3 w0.15: v3(16.25,13.5) 21.5,13.5 28.5,20.5 28.5,22 28.85,22.35 28.85,24.35 29.75,25.25 29.75,26.403 SERVO_1_6.5@29.743,26.41
  2 w0.15: v1(15.75,8.5) 15.75,13 v3(16.25,13.5)
FMU_CH6: SERVO_1_6.6 U301.61 | length 29.8
  TOP w0.15: U301.61@16.25,7.475 v1(16.25,9)
  3 w0.15: v3(16.75,14) 21.5,14 28.15,20.65 28.15,22.2 28.5,22.55 28.5,24.55 28.85,24.9 28.85,26.85 29.743,27.743 SERVO_1_6.6@29.743,28.95
  2 w0.15: v1(16.25,9) 16.25,12.85 16.75,13.35 v3(16.75,14)
FMU_I2C1_SCL: GPS_PORT.4 R202.2 U301.95 | length 36.3
  TOP w0.15: v3(11,17.35) 11.45,17.8 14.4,17.8 14.8,17.4 19.7,17.4 20.8,18.5 23.45,18.5 U301.95@24.775,18.5 26.1,18.5 26.35,18.25 R202.2@26.825,18.25
  3 w0.15: v2(4.75,14.5) v2(4.75,25) ; v2(11,14.5) v3(11,17.35)
  BOT w0.15: v2(4.75,14.5) v2(11,14.5)
FMU_I2C1_SDA: GPS_PORT.5 R203.2 U301.96 | length 31
  TOP w0.15: v4(11.75,18.5) 12.1,18.15 14.65,18.15 15.1,17.7 19.55,17.7 20.65,18.8 23.75,18.8 23.95,19 U301.96@24.775,19 25.75,19 26,19.25 R203.2@26.825,19.25
  2 w0.15: v3(11.1,26.35) 11.1,24.35 10.75,24 10.75,23.25 11.25,22.75 11.25,19 v4(11.75,18.5)
  BOT w0.15: GPS_PORT.5@4.75,26.25 5.7,26.25 5.95,26.5 10.6,26.5 10.75,26.35 v3(11.1,26.35)
FMU_LED_BLUE: R113.1 U301.89 | length 23.7
  TOP w0.15: R113.1@3.175,17.75 4,17.75 v1(5.5,16.25) ; v1(13.25,17) 14,17 14.2,16.8 22,16.8 23.3,15.5 U301.89@24.775,15.5
  2 w0.15: v1(5.5,16.25) 6.15,15.6 10,15.6 10.6,16.2 12.45,16.2 v1(13.25,17)
FMU_LED_GREEN: R114.1 U301.36 | length 9.3
  TOP w0.15: R114.1@3.175,19.45 6.75,19.45 7.05,19.15 7.6,19.15 8,18.75 8,16.55 8.55,16 U301.36@9.725,16
FMU_LED_RED: R115.1 U301.48 | length 12.8
  TOP w0.15: R115.1@3.175,18.6 4.2,18.6 8,14.8 8,10.25 8.25,10 U301.48@9.725,10
FMU_RC_INPUT: U301.35 U301.64 U1203.7 | length 29.1
  TOP w0.15: v1(8.5,16.75) 8.75,16.5 U301.35@9.725,16.5 16.75,16.5 v1(17.25,16) ; U301.64@17.75,7.475 v1(17.75,8.5)
  TOP w0.25: v1(9.1,26.75) U1203.7@9.7,26.75
  2 w0.15: v1(8.5,16.75) 9.25,17.5 9.25,21.8 9.1,21.95 v1(9.1,26.75) ; v1(17.25,16) 17.25,14.75 17.65,14.35 17.65,13.2 17.2,12.75 17.2,9.05 v1(17.75,8.5)
FMU_RC_OUTPUT: U301.63 U1203.6 | length 29.3
  TOP w0.15: U1203.6@9.7,26.25 10.2,26.25 10.75,26.8 11.6,26.8 12.6,27.8 v1(14.5,27.8) ; v1(17.25,6.5) U301.63@17.25,7.475
  2 w0.15: v1(14.5,27.8) 14.5,8.55 16.55,6.5 v1(17.25,6.5)
FMU_SWCLK: JTAG.5 U301.76 | length 6.3
  TOP w0.2: U301.76@24.775,9 v3(25.75,9)
  3 w0.15: v3(25.75,9) v2(30,9)
  BOT w0.15: v2(30,9) JTAG.5@31.08,9
FMU_SWDIO: JTAG.4 U301.72 | length 11
  TOP w0.15: U301.72@21.75,7.475 v3(21.75,8.5)
  3 w0.15: v3(21.75,8.5) 22.75,9.5 29.5,9.5 v2(30,10)
  BOT w0.15: v2@30.005,10.005 JTAG.4@31.094,10.005
FMU_UART7_RX: JTAG.3 U301.38 | length 26.5
  TOP w0.15: U301.38@9.725,15 v1(10.75,15) ; v1(11,10.5) v3(20,10.5)
  3 w0.15: v3(20,10.5) 21.65,10.5 22.65,11.5 24.95,11.5 25.45,11 v2(30,11)
  2 w0.15: v1(10.75,15) 10.75,14.3 11.25,13.8 11.25,11.386 11,11.136 v1(11,10.5)
  BOT w0.15: v2(30,11) JTAG.3@31.089,11
FMU_UART7_TX: JTAG.2 U301.39 | length 28.2
  TOP w0.15: U301.39@9.725,14.5 v1(11.25,14.5) ; v1(11.5,11) v3(19.5,11)
  3 w0.15: v3(19.5,11) 21.6,11 22.6,12 25,12 25.5,11.5 v2(32.25,11.5)
  2 w0.15: v1(11.25,14.5) 11.7,14.05 11.7,11.2 v1(11.5,11)
  BOT w0.15: JTAG.2@31.08,12 32.05,12 32.25,11.8 v2(32.25,11.5)
FMU_USART1_RX: ESP8266.1 U301.93 | length 21.6
  TOP w0.15: v1(23,17.5) U301.93@24.775,17.5 ; v1(24.75,34.9) ESP8266.1@26.41,34.9
  2 w0.15: v1(23,17.5) 23,19.95 23.75,20.7 23.75,33.9 v1(24.75,34.9)
FMU_USART1_TX: ESP8266.8 U301.92 | length 21.8
  TOP w0.15: ESP8266.8@18.79,29.5 18.79,29.89 19.65,30.75 v1(24.75,30.75) ; U301.92@24.775,17 v1(25.75,17)
  2 w0.15: v1(24.75,30.75) 24.75,18 v1(25.75,17)
FMU_USART2_CTS: TELEM1.4 U301.84 | length 10.5
  TOP w0.15: v1(23.5,13.25) 23.75,13 U301.84@24.775,13
  2 w0.15: v1(23.5,13.25) 24.75,12 24.75,5.6 24.95,5.4 v4(24.95,4.75)
FMU_USART2_RTS: TELEM1.5 U301.85 | length 10.7
  TOP w0.15: U301.85@24.775,13.5 v1(26,13.5)
  2 w0.15: v1(26,13.5) 25.25,12.75 25.25,5.7 v4(26.2,4.75)
FMU_USART2_RX: TELEM1.3 U301.87 | length 11.9
  TOP w0.15: v1(23.25,14.5) U301.87@24.775,14.5
  2 w0.15: v1(23.25,14.5) 23.25,13.75 22.75,13.25 22.75,10.3 23.7,9.35 v4(23.7,4.75)
FMU_USART2_TX: TELEM1.2 U301.86 | length 12.1
  TOP w0.15: v1(22.75,14) U301.86@24.775,14
  2 w0.15: v4(22.45,4.75) 23.25,5.55 23.25,9.25 22.35,10.15 22.35,13.6 v1(22.75,14)
FMU_USART3_CTS: TELEM2+OSD.4 U301.58 | length 15
  TOP w0.15: TELEM2+OSD.4@4.75,10.975 5.275,10.975 6.175,10.075 6.175,7.175 6.8,6.55 8.3,6.55 8.65,6.9 v1(10.25,6.9) ; v1(14.75,6.35) U301.58@14.75,7.475
  2 w0.15: v1(10.25,6.9) 14.2,6.9 v1(14.75,6.35)
FMU_USART3_RTS: TELEM2+OSD.5 U301.59 | length 15.1
  TOP w0.15: TELEM2+OSD.5@4.75,9.725 5.275,9.725 5.85,9.15 5.85,6.95 6.55,6.25 v1(9.1,6.25) ; U301.59@15.25,7.475 15.25,6.6 v1(15.5,6.35)
  2 w0.15: v1(9.1,6.25) 11.5,6.25 11.9,5.85 15,5.85 v1(15.5,6.35)
FMU_USART3_RX: TELEM2+OSD.3 U301.56 | length 16
  TOP w0.15: TELEM2+OSD.3@4.75,12.225 5.275,12.225 5.9,11.6 5.9,10.85 6.5,10.25 6.5,7.35 6.85,7 v1(8,7) ; v1(8,8.4) 10.5,8.4 10.95,8.85 13.3,8.85 13.75,8.4 U301.56@13.75,7.475
  2 w0.15: v1(8,7) v1(8,8.4)
FMU_USART3_TX: TELEM2+OSD.2 U301.55 | length 15
  TOP w0.15: TELEM2+OSD.2@4.75,13.475 5.325,13.475 5.9,12.9 5.9,12.25 6.25,11.9 6.25,11 6.825,10.425 6.825,7.575 6.832,7.582 6.85,7.582 6.982,7.45 7.8,7.45 8.35,8 10.6,8 11.1,8.5 13.1,8.5 13.25,8.35 U301.55@13.25,7.475
FMU_USART4_RX: GPS_PORT.3 U301.24 | length 9.2
  TOP w0.15: v3(10.75,22.5) 10.75,21.8 11.05,21.5 11.55,21.5 11.75,21.7 U301.24@11.75,22.525
  BOT w0.15: GPS_PORT.3@4.75,23.75 5.3,23.75 6.55,22.5 v3(10.75,22.5)
FMU_USART4_TX: GPS_PORT.2 U301.23 | length 9.4
  TOP w0.15: v3(10.25,22) 10.25,21.7 10.8,21.15 11.85,21.15 12.25,21.55 U301.23@12.25,22.525
  BOT w0.15: GPS_PORT.2@4.75,22.5 6.05,22.5 6.4,22.15 10.1,22.15 v3(10.25,22)
FMU_USART8_RX: U301.97 U1202.3 | length 2.5
  TOP w0.15: v3(23.5,19.25) 23.75,19.5 U301.97@24.775,19.5
  BOT w0.15: U1202.3@22.5,19 23.25,19 v3(23.5,19.25)
FMU_USART8_TX: U301.98 U1202.2 | length 2.5
  TOP w0.15: v3(23.75,20) U301.98@24.775,20
  BOT w0.15: U1202.2@22.5,19.5 22.95,19.5 23.45,20 v3(23.75,20)
FMU_VBAT: C320.2 D301.2 U301.6 | length 26.4
  TOP w0.15: v1(12.5,17) 12.95,17.45 14.15,17.45 14.5,17.1 19.85,17.1 20.75,18 v1(21.25,18) ; v1(20.5,21.35) 20.75,21.6 U301.6@20.75,22.525
  2 w0.15: v3(3.75,16.25) 4.7,16.25 5.2,16.75 5.75,16.75 6.55,15.95 9.85,15.95 10.4,16.5 12,16.5 v1(12.5,17) ; v1(20.5,21.35) 21.25,20.6 v1(21.25,18)
  BOT w0.15: D301.2@1.8,18 D301.2@2,17.8
  BOT w0.2: C320.2@2,17 D301.2@2,17.8 ; C320.2@2.58,16.25 v3(3.75,16.25)
FMU_VDD_3V3: 3V3.1 BUT/BUZ.3 C301.2 C310.2 C311.2 C312.2 C313.2 C314.2 C315.2 C316.2 C319.2 C402.1 C505.2 JTAG.1 LED100.4 R202.1 R203.1 R318.2 R319.1 R401.2 R410.2 R411.2 R412.2 R413.2 U10.5 U301.11 U301.19 U301.21 U301.22 U301.28 U301.50 U301.75 U301.100 U302.3 U302.7 U302.8 U304.5 U505.2 U1202.8 U1203.8 uSD401.4 | length 128.7
  TOP w0.15: v1(25.25,33.75) 27.3,33.75 27.55,34 28.95,34 29.6,33.35 U505.2@29.6,33.2 29.75,33.05 C505.2@29.75,31.925 ; C310.2@26.975,21 27.45,21 27.675,20.775 R203.1@27.675,19.25 R202.1@27.675,18.25
  TOP w0.2: v1(8.55,27.25) U1203.8@9.7,27.25 ; C316.2@13.075,24.25 C315.2@13.075,25.25 ; U301.100@24.3,21 24.3,21.4 ; U301.100@24.7,21 24.7,21.4 ; U301.100@25.1,21 25.1,21.4 ; U301.100@25.5,21 25.5,21.4 ; 3V3.1@27.25,14.5 v3(28.25,14.5)
  TOP w0.25: C314.2@7.45,9 10.55,9 11.025,9.475 ; C312.2@8.2,20 v1(8.75,20) ; U301.28@9.725,20 11.25,20 ; v1(11,15.75) 11.75,15 11.75,14.6 ; 12.75,21.25 U301.22@12.75,22.525 12.75,23.925 C316.2@13.075,24.25 ; 13.25,21.25 U301.21@13.25,22.525 C316.2@13.25,24.25 ; 14.25,21.25 U301.19@14.25,22.525 ; v1(18.25,21.35) U301.11@18.25,22.525 C313.2@18.25,24.1 ; U301.75@23.25,7.475 23.25,8.7 ; U301.75@23.25,7.5 C311.2@24.575,7.5 24.575,8.45 ; U301.75@23.25,8 24.575,8 ; 23.25,8.475 26.275,8.475 26.55,8.75 U10.5@27.275,8.75 ; 23.25,21 U301.100@24.775,21 C310.2@26.65,21 ; 23.9,7.5 23.9,8.45
  TOP w0.3: v1(8.75,20) U301.28@9.725,20
  3 w0.3: v2(8.5,2.75) v2(10.5,2.75) ; v5(18.5,17.175) v3(18.5,20.675)
  2 w0.15: v1(25.25,24.75) 25.25,31 25.5,31.25 25.5,33.5 v1(25.25,33.75)
  2 w0.2: v1(0.475,17.875) 0.475,15.525 0.75,15.25 1.75,15.25 ; v3(1.75,14.5) 1.75,15.25 ; v1(11,15.75) 10.65,15.75 10.15,15.25 1.75,15.25
  2 w0.25: v1(8.75,20) 8.1,20.65 8.1,21.95 8.55,22.4 v1(8.55,27.25) 8.55,31.55 8.95,31.95 10.4,31.95 v3(10.95,32.5)
  BOT w0.15: R319.1@0.75,15.5 R319.1@0.75,15.575 ; v3(18.5,20.675) 19.225,20.675 19.5,20.4 U1202.8@19.5,20
  BOT w0.2: R319.1@0.75,15.5 v3(1.75,14.5)
  BOT w0.25: BUT/BUZ.3@10.95,31.25 v3(10.95,32.5)
  BOT w0.3: U302.8@7,4.655 U302.7@7,3.385 8.215,3.385 8.5,3.1 v2(8.5,2.75) ; v2(10.5,2.75) 10.5,2.4 10.785,2.115 U302.3@12,2.115 15.365,2.115 15.85,2.6 15.85,8.4 v3(15.25,9) ; v5(18.5,17.175) 22.927,17.175 ; uSD401.4@22.927,14.55 22.927,17.175 ; JTAG.1@31.094,12.976 28.523,12.976 28.25,13.25 v3(28.25,14.5) 28.25,16.8 27.875,17.175 R401.2@27.327,17.175 22.927,17.175
  other v1: 19.5,9 18.75,9.5 18,10 19.5,10 18.25,13.5 19.25,13.5 18.75,14 19.75,14 18.25,14.5 19.25,14.5 20.25,14.5 17.75,20 18.5,20 20.25,20 17.75,20.65 20.25,20.65
FRAM_CS: U301.57 U302.1 | length 3.7
  TOP w0.15: v3(14,6.35) 14.25,6.6 U301.57@14.25,7.475
  BOT w0.15: U302.1@12.5,4.7 12.5,5.15 13.7,6.35 v3(14,6.35)
FRAM_MISO: U301.53 U302.2 U503.6 | length 16.6
  TOP w0.15: v3(12.25,6.35) U301.53@12.25,7.475
  BOT w0.15: U503.6@4.1,10.875 4.375,10.875 5.4,9.85 5.4,8.7 6.8,7.3 11.3,7.3 v3(12.25,6.35) 10.7,4.8 10.7,3.55 10.865,3.385 U302.2@12,3.385
FRAM_MOSI: U301.54 U302.5 U503.7 | length 19.4
  TOP w0.15: U301.54@12.75,7.475 12.75,6.6 v3(13,6.35)
  3 w0.15: v2(10,6.35) 10.6,5.75 12.4,5.75 v3(13,6.35)
  BOT w0.15: U503.7@4.1,9.625 4.375,9.625 5,9 5,8.6 6.6,7 9.35,7 v2(10,6.35) ; U302.5@7,0.845 8.145,0.845 10,2.7 10,4.75 v2(11,5.75)
FRAM_SCK: U301.47 U302.6 U503.8 | length 18.5
  TOP w0.15: v1(8.5,10.5) U301.47@9.725,10.5
  2 w0.15: v1(8.5,10.5) 8.5,5.9 8.8,5.6 v3(9.1,5.6)
  BOT w0.15: U503.8@4.1,8.375 4.725,8.375 6.45,6.65 8.75,6.65 9.1,6.3 v3(9.1,5.6) 9.1,2.5 8.715,2.115 U302.6@7,2.115
FRSKY_IN: R454.1 SERIAL4/FrSky.3 | length 19
  TOP w0.15: v4(12.2,19.05) v3(16.75,19.05)
  2 w0.15: v1(9.775,31.25) 10.35,31.25 11.65,29.95 11.65,29.35 12.2,28.8 v4(12.2,19.05)
  BOT w0.15: v3(16.75,19.05) 17.05,18.75 R454.1@17.575,18.75
FRSKY_INV: U301.69 U1202.1 U1202.5 | length 20
  TOP w0.15: U301.69@20.25,7.475 20.25,6.65 20.35,6.55 v3(20.35,6.25)
  BOT w0.15: v3@20.25,6.25 17.75,8.75 17.75,9.3 18,9.55 18,18 18.2,18.2 18.95,18.2 19.25,18.5 U1202.5@19.5,18.5 20,18.5 20.25,18.75 20.25,19.7 20.55,20 U1202.1@22.5,20
FRSKY_OUT: R452.1 SERIAL4/FrSky.2 | length 17.4
  TOP w0.15: v4(12.75,19.5) v3(16.25,19.5)
  2 w0.15: v1(11.025,31.25) 12,30.275 12,29.5 12.5,29 12.5,26 12.75,25.75 v4(12.75,19.5)
  BOT w0.15: v3(16.25,19.5) 16.5,19.75 R452.1@17.575,19.75